# Altium PCB HONGGAN_拼版.PcbDoc (part 3 of 5)
Units mm, origin at the board's own origin, x right, y up, seen from the top; angles counter-clockwise.
Board outline 106.01 x 72.01 mm, 4 copper layers (Top Layer, Mid-Layer 1, Mid-Layer 2, Bottom Layer); 400 components, 0 nets, 1244 pads, 3211 vias.
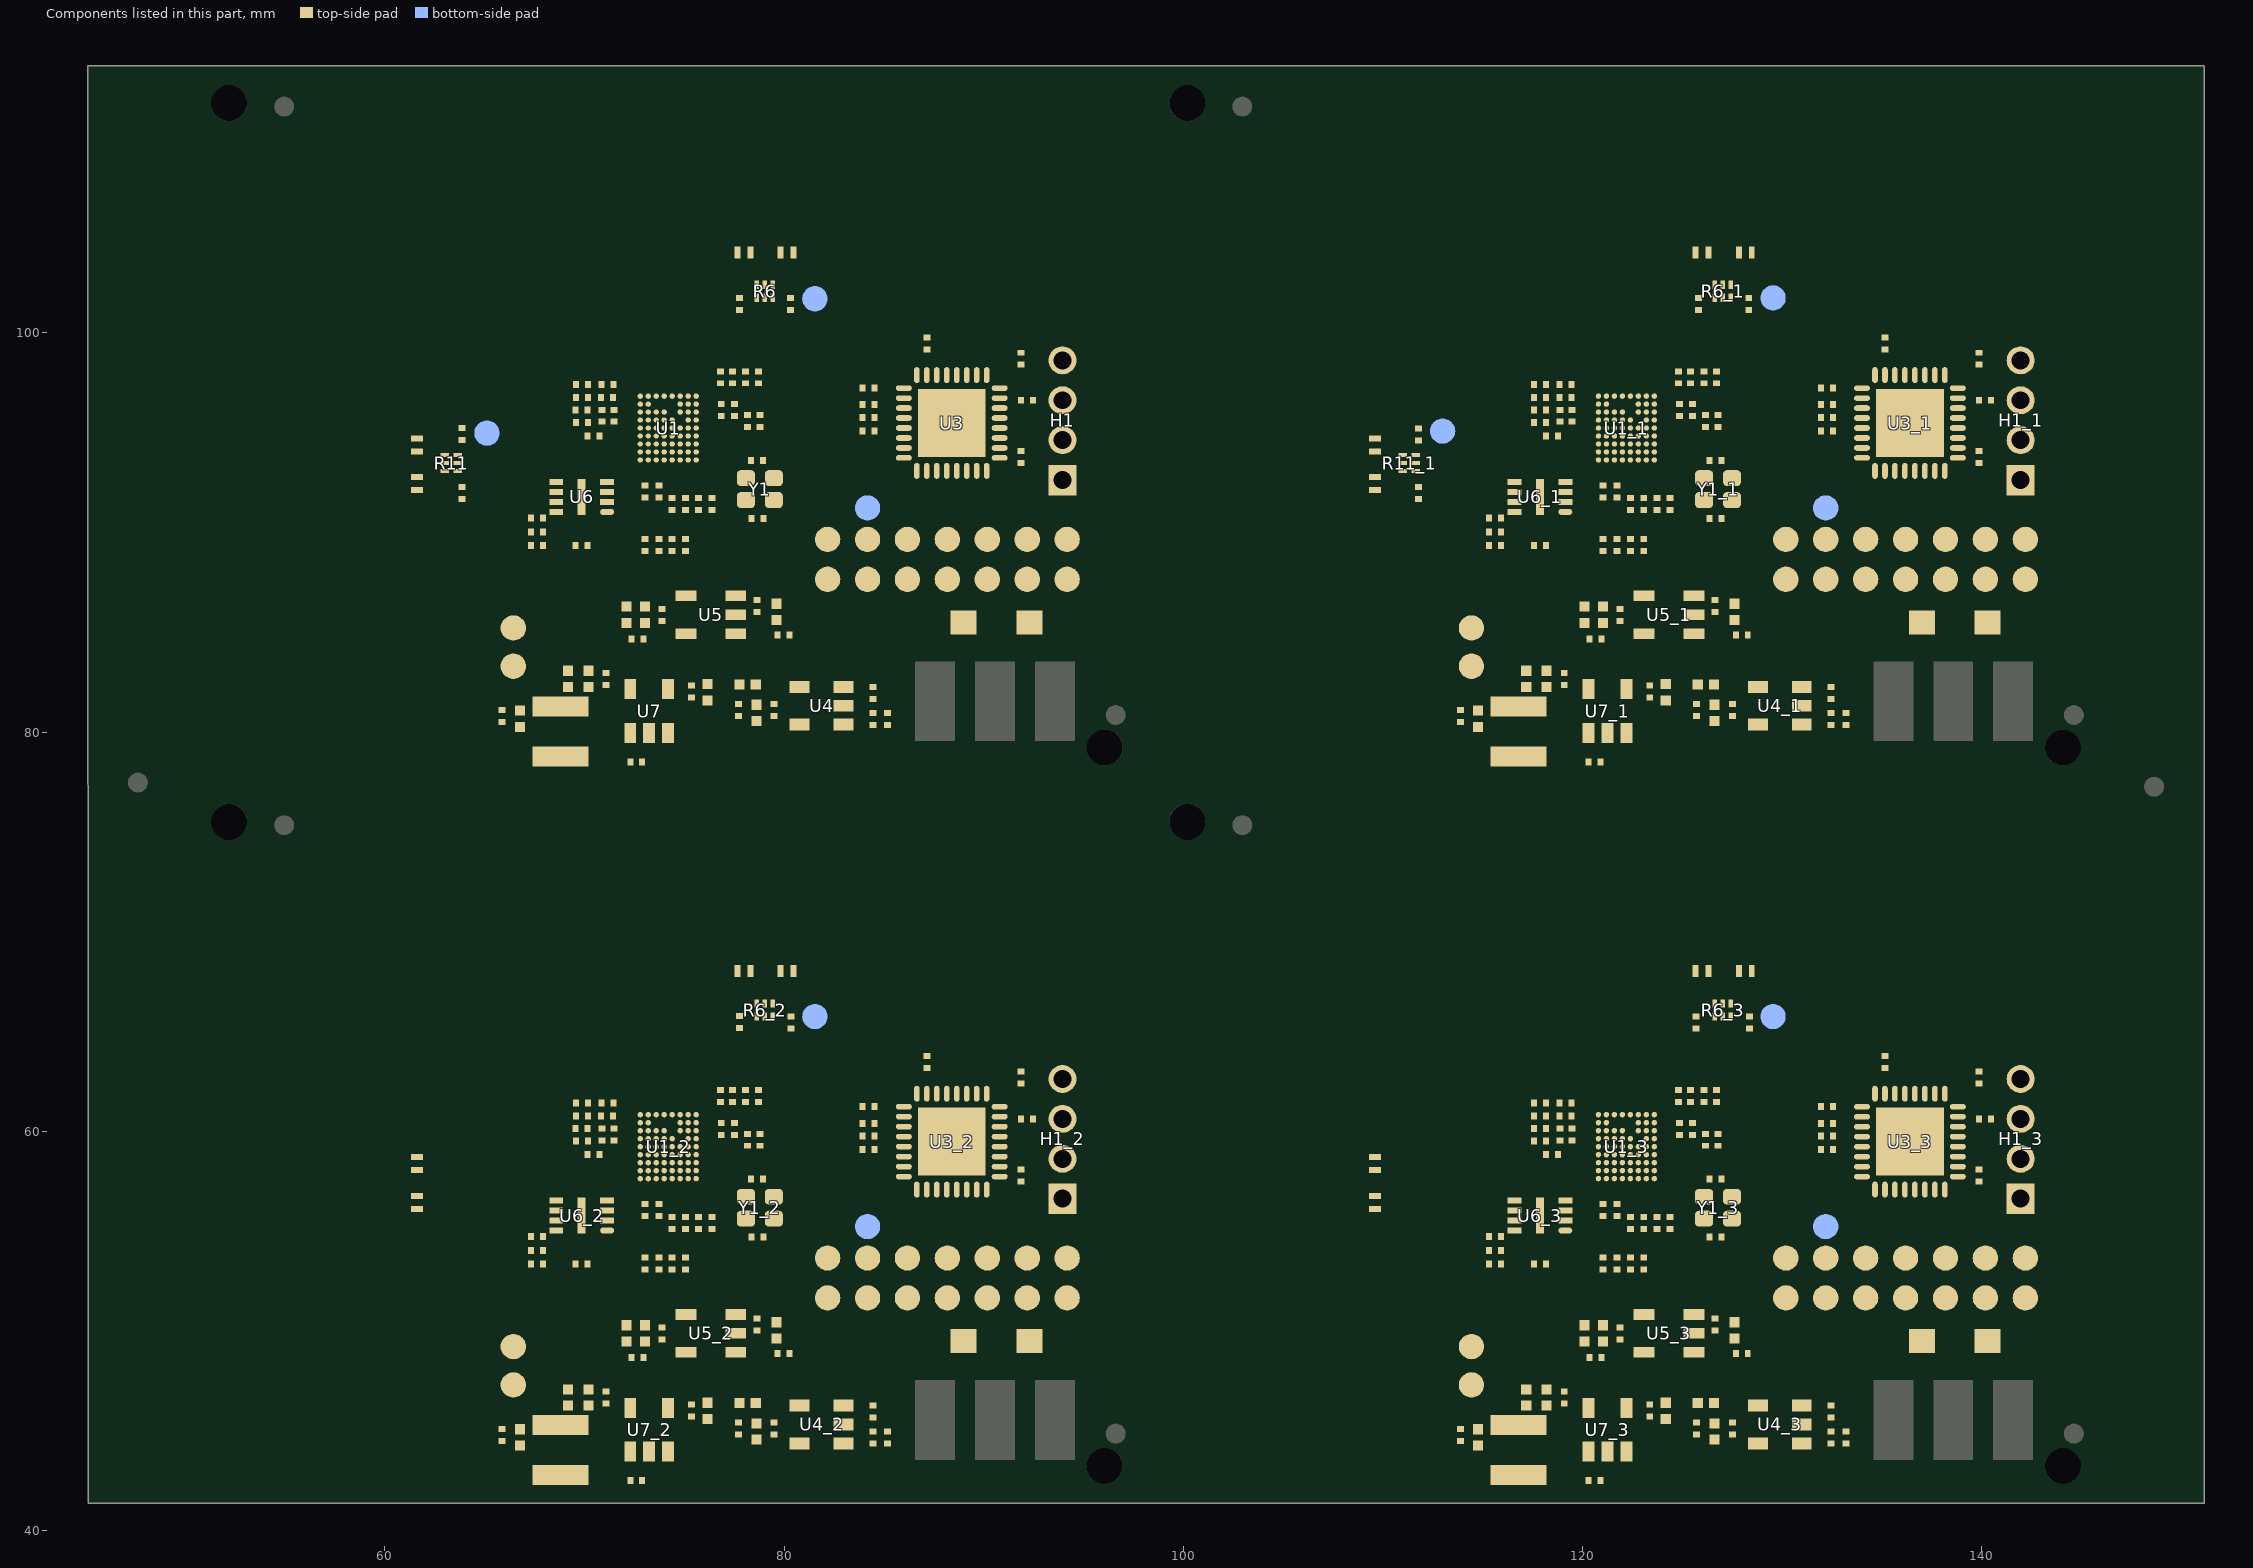
[diagram p5: the components of this part, seen from the top]

## Via types
v1: diameter 0.3, hole 0.2, Top Layer to Bottom Layer, tented both sides, 3151 vias
v2: diameter 0.5, hole 0.3, Top Layer to Bottom Layer, tented both sides, 48 vias
v3: diameter 0.3, hole 0.2, Top Layer to Bottom Layer, 12 vias

## Nets (pads, with @x,y where several pads share a name; then routed paths per layer and width w, separated by ;. In a path a pad name is that pad's centre, name@x,y a point inside that pad or via, vN(x,y) a via of type N, cw(c..) or ccw(c..) an arc to the next point about the centre after c; other vN are vias at no path point) (continued)
copper on no net: | length 2759.6
  Top Layer w0.147: v1(67.808,55.529) 68.583,55.529 ; v1(67.808,91.529) 68.583,91.529 ; v1(67.823,56.015) 67.837,56.029 68.583,56.029 ; v1(67.823,92.015) 67.837,92.029 68.583,92.029 ; 68.583,55.029 68.208,55.029 67.908,54.729 67.908,54.02 67.908,53.35 69.558,53.35 ; 68.583,56.529 69.775,57.721 70.875,57.721 72.387,59.233 72.792,59.233 ; 68.583,91.029 68.208,91.029 67.908,90.729 67.908,90.02 67.908,89.35 69.558,89.35 ; 68.583,92.529 69.775,93.721 70.875,93.721 72.387,95.233 72.792,95.233 ; 70.158,53.35 71.133,54.325 71.133,55.029 71.642,55.029 72.406,55.793 72.406,57.721 72.653,57.968 72.728,57.968 72.792,58.033 ; 70.158,89.35 71.133,90.325 71.133,91.029 71.642,91.029 72.406,91.793 72.406,93.721 72.653,93.968 72.728,93.968 72.792,94.033 ; 71.133,55.529 71.492,55.529 72.106,56.143 72.106,57.966 72.549,58.409 72.768,58.409 72.792,58.433 ; 71.133,56.029 71.483,56.029 71.806,56.352 71.806,58.09 72.548,58.833 72.792,58.833 ; 71.133,91.529 71.492,91.529 72.106,92.143 72.106,93.966 72.549,94.409 72.768,94.409 72.792,94.433 ; 71.133,92.029 71.483,92.029 71.806,92.352 71.806,94.09 72.548,94.833 72.792,94.833 ; v1(115.808,55.529) 116.583,55.529 ; v1(115.808,91.529) 116.583,91.529 ; v1(115.823,56.015) 115.837,56.029 116.583,56.029 ; v1(115.823,92.015) 115.837,92.029 116.583,92.029 ; 116.583,55.029 116.208,55.029 115.908,54.729 115.908,54.02 115.908,53.35 117.558,53.35 ; 116.583,56.529 117.775,57.721 118.875,57.721 120.387,59.233 120.792,59.233 ; 116.583,91.029 116.208,91.029 115.908,90.729 115.908,90.02 115.908,89.35 117.558,89.35 ; 116.583,92.529 117.775,93.721 118.875,93.721 120.387,95.233 120.792,95.233 ; 118.158,53.35 119.133,54.325 119.133,55.029 119.642,55.029 120.406,55.793 120.406,57.721 120.653,57.968 120.728,57.968 120.792,58.033 ; 118.158,89.35 119.133,90.325 119.133,91.029 119.642,91.029 120.406,91.793 120.406,93.721 120.653,93.968 120.728,93.968 120.792,94.033 ; 119.133,55.529 119.492,55.529 120.106,56.143 120.106,57.966 120.549,58.409 120.768,58.409 120.792,58.433 ; 119.133,56.029 119.483,56.029 119.806,56.352 119.806,58.09 120.548,58.833 120.792,58.833 ; 119.133,91.529 119.492,91.529 120.106,92.143 120.106,93.966 120.549,94.409 120.768,94.409 120.792,94.433 ; 119.133,92.029 119.483,92.029 119.806,92.352 119.806,94.09 120.548,94.833 120.792,94.833
  Top Layer w0.203: v3@58.144,44.968 59.773,44.968 ccw(c59.773,46.741) 61.027,45.487 ccw(c59.639,46.875) 61.602,46.875 61.602,56.118 ; v3@58.144,62.368 58.144,61.92 ccw(c61.348,61.92) 59.082,59.654 ccw(c61.348,61.92) 61.348,58.715 61.602,58.715 63.688,58.715 ccw(c63.688,59.618) 64.326,58.98 ccw(c61.595,62.437) 65.559,60.516 ccw(c60.177,63.123) 66.081,62.167 66.263,63.295 cw(c69.709,62.148) 67.141,64.716 cw(c70.356,61.501) 70.356,66.047 cw(c70.356,61.734) 73.406,64.784 cw(c71.992,63.37) 73.992,63.37 73.992,60.833 ; v3(58.144,80.968) 58.907,80.968 ccw(c58.907,83.439) 60.655,81.692 ccw(c58.369,83.978) 61.602,83.978 61.602,92.118 ccw(c61.602,93.166) 62.343,92.425 62.998,93.079 ; v3(58.144,98.368) 58.144,97.92 ccw(c60.684,97.92) 58.888,96.124 59.552,95.46 ccw(c61.348,97.256) 61.348,94.716 61.602,94.716 cw(c61.602,93.364) 62.558,94.32 62.998,93.88 ; 61.602,56.122 ccw(c61.88,60.985) 65.324,57.54 cw(c66.172,56.848) 65.519,57.727 66.884,59.092 ccw(c62.312,63.665) 68.286,61.19 ccw(c66.917,61.757) 68.399,61.757 cw(c71.186,61.757) 69.215,63.727 cw(c70.116,62.827) 70.116,64.101 70.723,64.101 cw(c70.723,61.561) 72.519,63.357 72.55,63.326 cw(c71,61.776) 73.192,61.776 73.192,60.833 ; 63.648,93.079 63.858,92.87 63.858,92.268 64.114,92.268 69.268,97.422 69.562,97.422 69.562,97.71 69.931,98.079 v2(71.439,98.079) ; 63.648,93.48 63.778,93.48 ccw(c63.778,94.47) 64.479,93.77 65.766,95.057 ccw(c63.969,96.853) 66.509,96.853 cw(c68.831,96.853) 67.189,98.494 67.863,99.167 cw(c70.116,96.914) 70.116,100.101 70.723,100.101 cw(c70.723,97.561) 72.519,99.357 72.55,99.326 cw(c71,97.776) 73.192,97.776 73.192,96.833 ; 63.648,93.88 63.648,94.435 63.858,94.645 64.782,94.645 v1(65.113,94.976) ; v1(66.637,51.401) v1(66.637,53.306) 66.681,53.35 67.308,53.35 ; v1(66.637,87.401) v1(66.637,89.306) 66.681,89.35 67.308,89.35 ; 68.796,42.787 69.848,42.787 71.872,44.811 73.701,44.811 74.191,44.321 74.191,43.951 ; 68.796,78.787 69.848,78.787 71.872,80.811 73.701,80.811 74.191,80.321 74.191,79.951 ; v1(69.555,58.833) 68.423,58.833 65.808,56.217 65.808,51.261 66.787,50.283 69.3,50.283 72.373,47.21 83.537,47.21 85.179,48.851 85.179,52.434 86.178,53.433 ; v1(69.555,94.833) 68.423,94.833 65.808,92.217 65.808,87.261 66.787,86.283 69.3,86.283 72.373,83.21 83.537,83.21 85.179,84.851 85.179,88.434 86.178,89.433 ; 69.559,60.148 69.559,59.511 69.562,59.508 v1@69.562,58.839 ; 69.559,96.148 69.559,95.511 69.562,95.508 v1@69.562,94.839 ; 69.562,61.422 69.562,62 70.076,62.514 v2(70.757,62.514) ; 70.159,60.148 70.162,60.151 70.162,61.422 ; 70.159,96.148 70.162,96.151 70.162,97.422 ; v2@70.744,58.147 70.751,58.153 70.751,58.826 70.757,58.833 71.412,58.833 72.212,59.633 72.792,59.633 ; v2@70.744,94.147 70.751,94.153 70.751,94.826 70.757,94.833 71.412,94.833 72.212,95.633 72.792,95.633 ; 70.867,60.148 71.467,60.148 71.582,60.033 72.792,60.033 ; 70.867,96.148 71.467,96.148 71.582,96.033 72.792,96.033 ; v1(71.254,42.511) 72.291,42.511 72.291,43.951 ; v1(71.254,78.511) 72.291,78.511 72.291,79.951 ; v3@71.726,71.297 72.482,70.541 ccw(c74.278,72.337) 74.278,69.797 74.852,69.797 cw(c74.852,67.257) 76.648,69.053 77.663,68.038 ccw(c79.288,68.038) 78.139,66.889 78.626,66.402 ; v3(71.726,107.297) 72.482,106.541 ccw(c74.278,108.337) 74.278,105.797 74.852,105.797 cw(c74.852,103.257) 76.648,105.053 77.663,104.038 ccw(c79.288,104.038) 78.139,102.889 78.626,102.402 ; v1(72.757,92.885) 73.179,93.307 73.179,93.62 73.192,93.633 ; 73.022,53.675 v1(73.022,54.188) ; 73.022,55.751 73.057,55.716 73.057,55.368 72.496,54.807 72.496,52.594 73.436,51.655 82.189,51.655 ; 73.022,56.351 73.592,56.92 73.592,57.633 ; 73.022,89.675 v1(73.022,90.188) ; 73.022,91.751 73.057,91.716 73.057,91.368 72.496,90.807 72.496,88.594 73.436,87.655 82.189,87.655 ; 73.022,92.351 73.592,92.92 73.592,93.633 ; 73.029,53.068 73.808,52.29 81.592,52.29 82.065,52.762 82.808,52.762 83.479,53.433 84.127,53.433 ; 73.029,89.068 73.579,88.518 81.831,88.518 82.546,88.518 82.555,88.509 83.479,89.433 84.127,89.433 ; 73.727,53.075 74.392,53.075 ; 73.727,53.675 73.752,53.675 73.8,53.723 73.8,54.099 74.013,54.311 v1(74.013,54.324) ; v1(73.727,54.945) 73.727,55.751 ; 73.727,56.351 73.992,56.616 73.992,57.633 ; 73.727,89.075 74.392,89.075 ; 73.727,89.675 73.752,89.675 73.8,89.723 73.8,90.099 74.013,90.311 v1(74.013,90.324) ; v1(73.727,90.945) 73.727,91.751 ; 73.727,92.351 73.992,92.616 73.992,93.633 ; v1(74.392,52.897) 74.392,53.075 ; 74.392,53.675 v1(74.392,54.099) 74.392,55.118 ; 74.392,55.718 74.392,56.15 74.688,56.446 74.762,56.446 v1(74.771,56.455) ; 74.392,60.833 cw(c77.514,60.833) 75.306,63.04 75.508,63.242 cw(c77.582,61.168) 77.582,64.101 ccw(c77.582,65.622) 78.657,64.546 ccw(c77.768,65.436) 79.026,65.436 79.026,65.752 ; v1(74.392,88.897) 74.392,89.075 ; 74.392,89.675 v1(74.392,90.099) 74.392,91.118 ; 74.392,91.718 74.392,92.15 74.688,92.446 74.762,92.446 v1(74.771,92.455) ; 74.392,96.833 cw(c77.514,96.833) 75.306,99.04 75.508,99.242 cw(c77.582,97.168) 77.582,100.101 ccw(c77.582,101.622) 78.657,100.546 ccw(c77.768,101.436) 79.026,101.436 79.026,101.752 ; 74.792,57.633 74.792,57.38 75.717,56.455 75.717,55.718 ; 74.792,93.633 74.792,93.38 75.717,92.455 75.717,91.718 ; 75.062,53.075 74.392,53.075 ; 75.062,55.118 75.062,53.675 80.087,53.675 80.734,54.322 80.734,55.544 82.274,57.084 86.646,57.084 86.646,56.538 89.751,53.433 90.178,53.433 ; 75.062,55.718 75.062,56.173 75.178,56.288 75.178,56.44 v1(75.187,56.449) ; 75.062,89.075 74.392,89.075 ; 75.062,91.118 75.062,89.675 80.087,89.675 80.734,90.322 80.734,91.544 82.274,93.084 86.646,93.084 86.646,92.538 89.751,89.433 90.178,89.433 ; 75.062,91.718 75.062,92.173 75.178,92.288 75.178,92.44 v1(75.187,92.449) ; 75.192,60.433 75.592,60.433 78.073,60.433 ; 75.192,60.833 75.203,60.844 75.203,60.994 75.431,61.222 75.685,61.476 76.803,61.476 77.407,61.476 ; 75.192,96.433 75.592,96.433 78.073,96.433 ; 75.192,96.833 75.203,96.844 75.203,96.994 75.431,97.222 75.685,97.476 76.803,97.476 77.407,97.476 ; 75.592,58.433 75.592,58.033 75.603,58.022 75.753,58.022 76.073,57.702 76.073,56.335 76.382,56.026 76.382,55.718 ; 75.592,58.833 75.763,58.833 76.325,58.271 76.329,58.271 77.229,57.37 77.229,56.173 77.779,55.623 78.084,55.623 78.084,54.988 78.366,54.706 ; 75.592,59.233 75.628,59.196 75.743,59.196 75.751,59.188 75.911,59.188 76.473,58.626 76.476,58.626 76.991,58.112 78.618,58.112 78.95,57.78 78.95,57.605 78.95,57.257 79.484,56.723 ; 75.592,60.033 75.999,60.033 76.445,59.586 76.445,59.583 76.579,59.449 76.582,59.449 76.603,59.428 78.008,59.428 78.158,59.278 ; 75.592,60.833 77.77,60.833 78.073,61.136 78.073,61.476 78.708,61.476 ; 75.592,94.433 75.592,94.033 75.603,94.022 75.753,94.022 76.073,93.702 76.073,92.335 76.382,92.026 76.382,91.718 ; 75.592,94.833 75.763,94.833 76.325,94.271 76.329,94.271 77.229,93.37 77.229,92.173 77.779,91.623 78.084,91.623 78.084,90.988 78.366,90.706 ; 75.592,95.233 75.628,95.196 75.743,95.196 75.751,95.188 75.911,95.188 76.473,94.626 76.476,94.626 76.991,94.112 78.618,94.112 78.95,93.78 78.95,93.605 78.95,93.257 79.484,92.723 ; 75.592,96.033 75.999,96.033 76.445,95.586 76.445,95.583 76.579,95.449 76.582,95.449 76.603,95.428 78.008,95.428 78.158,95.278 ; 75.592,96.833 77.77,96.833 78.073,97.136 78.073,97.476 78.708,97.476 ; v2(77.058,65.752) 78.626,65.752 ; v2(77.058,101.752) 78.626,101.752 ; 78.708,62.076 v2(79.047,62.076) ; 78.708,98.076 v2(79.047,98.076) ; 79.426,65.752 80.353,65.752 81.525,65.752 v1(81.54,65.736) ; 79.426,66.402 80.055,67.031 ccw(c79.049,68.038) 80.472,68.038 85.153,68.038 ccw(c85.153,70.578) 86.949,68.782 89.247,71.08 ; 79.426,101.752 80.147,101.752 ; 79.426,102.402 80.055,103.031 ccw(c79.049,104.038) 80.472,104.038 85.153,104.038 ccw(c85.153,106.578) 86.949,104.782 89.247,107.08 ; 80.322,101.736 81.513,101.736 v1(81.54,101.708) ; v1(81.54,61.499) 81.54,58.417 82.224,57.734 85.995,57.734 ; v1(81.54,97.499) 81.54,94.417 82.224,93.734 85.995,93.734 ; v1(84.532,58.259) 84.567,58.224 85.985,58.224 85.995,58.234 ; v1(84.532,60.403) 84.532,59.769 84.567,59.734 85.995,59.734 ; v1(84.532,94.259) 84.567,94.224 85.985,94.224 85.995,94.234 ; v1(84.532,96.403) 84.532,95.769 84.567,95.734 85.995,95.734 ; 87.145,61.884 87.145,63.166 ; 87.145,97.884 87.145,99.166 ; 89.247,71.08 ccw(c89.03,71.297) v3@89.337,71.297 ; 89.247,107.08 ccw(c89.03,107.297) v3(89.337,107.297) ; 90.178,51.655 91.448,50.385 94.831,50.385 95.593,51.147 95.593,63.212 94.621,64.184 93.942,64.184 ; 90.178,87.655 91.448,86.385 94.831,86.385 95.593,87.147 95.593,99.212 94.621,100.184 93.942,100.184 ; 90.796,57.734 91.165,57.734 v2@91.868,57.031 ; 90.796,58.734 v1@91.367,58.734 ; 90.796,60.734 91.758,60.734 91.868,60.624 91.868,61.094 92.418,61.644 93.942,61.644 ; 90.796,61.234 91.367,61.234 91.868,61.734 91.868,62.404 92.168,62.404 92.468,62.704 92.468,63.697 92.955,64.184 93.942,64.184 ; 90.796,93.734 91.165,93.734 v2@91.868,93.031 ; 90.796,94.734 v1(91.367,94.734) ; 90.796,96.734 91.758,96.734 91.868,96.624 91.868,97.094 92.418,97.644 93.942,97.644 ; 90.796,97.234 91.367,97.234 91.868,97.734 91.868,98.404 92.168,98.404 92.468,98.704 92.468,99.697 92.955,100.184 93.942,100.184 ; 91.868,57.484 v2@91.868,57.031 ; 91.868,93.484 v2@91.868,93.031 ; v2@91.889,56.967 92.178,56.679 v2(92.178,56.354) 92.178,55.433 94.178,53.433 ; v2@91.889,92.967 92.178,92.679 v2(92.178,92.354) 92.178,91.433 94.178,89.433 ; v2(91.91,56.989) v2@91.868,57.031 ; v2(91.91,92.989) v2@91.868,93.031 ; 92.127,51.655 92.527,51.655 93.441,50.74 94.552,50.74 95.212,51.401 95.212,60.755 94.323,61.644 93.942,61.644 ; 92.127,87.655 92.527,87.655 93.441,86.74 94.552,86.74 95.212,87.401 95.212,96.755 94.323,97.644 93.942,97.644 ; v1(92.468,59.942) 92.468,60.624 ; v1(92.468,95.942) 92.468,96.624 ; 93.942,60.624 93.942,61.644 ; 93.942,62.624 93.942,64.184 ; 93.942,96.624 93.942,97.644 ; 93.942,98.624 93.942,100.184 ; v3(106.144,43.468) ccw(c106.144,46.961) 108.614,44.491 ccw(c106.23,46.875) 109.602,46.875 109.602,56.118 ; v3(106.144,60.868) ccw(c107.269,60.868) 106.473,60.072 106.757,59.789 ccw(c109.348,62.38) 109.348,58.715 109.602,58.715 111.688,58.715 ccw(c111.688,59.618) 112.326,58.98 ccw(c109.595,62.437) 113.559,60.516 ccw(c108.177,63.123) 114.081,62.167 114.263,63.295 cw(c117.709,62.148) 115.141,64.716 cw(c118.356,61.501) 118.356,66.047 cw(c118.356,61.734) 121.406,64.784 cw(c119.992,63.37) 121.992,63.37 121.992,60.833 ; v1(106.144,79.468) 108.858,82.182 ccw(c107.062,83.978) 109.602,83.978 109.602,92.118 ccw(c109.602,93.166) 110.343,92.425 110.998,93.079 ; v1(106.144,96.868) 107.552,95.46 ccw(c109.348,97.256) 109.348,94.716 109.602,94.716 cw(c109.602,93.364) 110.558,94.32 110.998,93.88 ; 109.602,56.122 ccw(c109.88,60.985) 113.324,57.54 cw(c114.172,56.848) 113.519,57.727 114.884,59.092 ccw(c110.312,63.665) 116.286,61.19 ccw(c114.917,61.757) 116.399,61.757 cw(c119.186,61.757) 117.215,63.727 cw(c118.116,62.827) 118.116,64.101 118.723,64.101 cw(c118.723,61.561) 120.519,63.357 120.55,63.326 cw(c119,61.776) 121.192,61.776 121.192,60.833 ; 111.648,93.48 111.778,93.48 ccw(c111.778,94.47) 112.479,93.77 113.766,95.057 ccw(c111.969,96.853) 114.509,96.853 cw(c116.831,96.853) 115.189,98.494 115.863,99.167 cw(c118.116,96.914) 118.116,100.101 118.723,100.101 cw(c118.723,97.561) 120.519,99.357 120.55,99.326 cw(c119,97.776) 121.192,97.776 121.192,96.833 ; 111.648,93.88 111.648,94.473 111.778,94.603 112.025,94.85 112.037,94.85 112.091,94.903 v1(112.926,94.903) ; 111.778,92.279 111.778,92.949 111.648,93.079 112.926,93.079 117.268,97.422 117.562,97.422 117.562,97.71 117.931,98.079 v2(119.439,98.079) ; v1(114.637,51.401) v1(114.637,53.306) 114.681,53.35 115.308,53.35 ; v1(114.637,87.401) v1(114.637,89.306) 114.681,89.35 115.308,89.35 ; 116.796,42.787 117.848,42.787 119.872,44.811 121.701,44.811 122.191,44.321 122.191,43.951 ; 116.796,78.787 117.848,78.787 119.872,80.811 121.701,80.811 122.191,80.321 122.191,79.951 ; v1(117.555,58.833) 116.423,58.833 113.808,56.217 113.808,51.261 114.787,50.283 117.3,50.283 120.373,47.21 131.537,47.21 133.179,48.851 133.179,52.434 134.178,53.433 ; v1(117.555,94.833) 116.423,94.833 113.808,92.217 113.808,87.261 114.787,86.283 117.3,86.283 120.373,83.21 131.537,83.21 133.179,84.851 133.179,88.434 134.178,89.433 ; 117.559,60.148 117.559,59.511 117.562,59.508 v1@117.562,58.839 ; 117.559,96.148 117.559,95.511 117.562,95.508 v1@117.562,94.839 ; 117.562,61.422 117.562,62 118.076,62.514 v2(118.757,62.514) ; 118.159,60.148 118.162,60.151 118.162,61.422 ; 118.159,96.148 118.162,96.151 118.162,97.422 ; v2@118.744,58.147 118.751,58.153 118.751,58.826 118.757,58.833 119.412,58.833 120.212,59.633 120.792,59.633 ; v2@118.744,94.147 118.751,94.153 118.751,94.826 118.757,94.833 119.412,94.833 120.212,95.633 120.792,95.633 ; 118.867,60.148 119.467,60.148 119.582,60.033 120.792,60.033 ; 118.867,96.148 119.467,96.148 119.582,96.033 120.792,96.033 ; v1(119.254,42.511) 120.291,42.511 120.291,43.951 ; v1(119.254,78.511) 120.291,78.511 120.291,79.951 ; v3(119.726,69.797) 122.852,69.797 cw(c122.852,67.257) 124.648,69.053 125.663,68.038 ccw(c127.288,68.038) 126.139,66.889 126.626,66.402 ; v1(119.726,105.797) 122.852,105.797 cw(c122.852,103.257) 124.648,105.053 125.663,104.038 ccw(c127.288,104.038) 126.139,102.889 126.626,102.402 ; v1(120.757,92.885) 121.179,93.307 121.179,93.62 121.192,93.633 ; 121.022,53.675 v1(121.022,54.188) ; 121.022,55.751 121.057,55.716 121.057,55.368 120.496,54.807 120.496,52.594 121.436,51.655 130.189,51.655 ; 121.022,56.351 121.592,56.92 121.592,57.633 ; 121.022,89.675 v1(121.022,90.188) ; 121.022,91.751 121.057,91.716 121.057,91.368 120.496,90.807 120.496,88.594 121.436,87.655 130.189,87.655 ; 121.022,92.351 121.592,92.92 121.592,93.633 ; 121.029,53.068 121.579,52.518 129.831,52.518 130.546,52.518 130.555,52.509 131.479,53.433 132.127,53.433 ; 121.029,89.068 121.686,88.411 129.761,88.411 130.043,88.692 130.739,88.692 131.479,89.433 132.127,89.433 ; 121.727,53.075 122.392,53.075 ; 121.727,53.675 121.752,53.675 121.8,53.723 121.8,54.099 122.013,54.311 v1(122.013,54.324) ; v1(121.727,54.945) 121.727,55.751 ; 121.727,56.351 121.992,56.616 121.992,57.633 ; 121.727,89.075 122.392,89.075 ; 121.727,89.675 121.752,89.675 121.8,89.723 121.8,90.099 122.013,90.311 v1(122.013,90.324) ; v1(121.727,90.945) 121.727,91.751 ; 121.727,92.351 121.992,92.616 121.992,93.633 ; v1(122.392,52.897) 122.392,53.075 ; 122.392,53.675 v1(122.392,54.099) 122.392,55.118 ; 122.392,55.718 122.392,56.15 122.688,56.446 122.762,56.446 v1(122.771,56.455) ; 122.392,60.833 cw(c125.514,60.833) 123.306,63.04 123.508,63.242 cw(c125.582,61.168) 125.582,64.101 ccw(c125.582,65.622) 126.657,64.546 ccw(c125.768,65.436) 127.026,65.436 127.026,65.752 ; v1(122.392,88.897) 122.392,89.075 ; 122.392,89.675 v1(122.392,90.099) 122.392,91.118 ; 122.392,91.718 122.392,92.15 122.688,92.446 122.762,92.446 v1(122.771,92.455) ; 122.392,96.833 cw(c125.514,96.833) 123.306,99.04 123.508,99.242 cw(c125.582,97.168) 125.582,100.101 ccw(c125.582,101.622) 126.657,100.546 ccw(c125.768,101.436) 127.026,101.436 127.026,101.752 ; 122.792,57.633 122.792,57.38 123.717,56.455 123.717,55.718 ; 122.792,93.633 122.792,93.38 123.717,92.455 123.717,91.718 ; 123.062,53.075 122.392,53.075 ; 123.062,55.118 123.062,53.675 128.087,53.675 128.734,54.322 128.734,55.544 130.274,57.084 134.646,57.084 134.646,56.538 137.751,53.433 138.178,53.433 ; 123.062,55.718 123.062,56.173 123.178,56.288 123.178,56.44 v1(123.187,56.449) ; 123.062,89.075 122.392,89.075 ; 123.062,91.118 123.062,89.675 128.087,89.675 128.734,90.322 128.734,91.544 130.274,93.084 134.646,93.084 134.646,92.538 137.751,89.433 138.178,89.433 ; 123.062,91.718 123.062,92.173 123.178,92.288 123.178,92.44 v1(123.187,92.449) ; 123.192,60.433 123.592,60.433 126.073,60.433 ; 123.192,60.833 123.203,60.844 123.203,60.994 123.431,61.222 123.685,61.476 124.803,61.476 125.407,61.476 ; 123.192,96.433 123.592,96.433 126.073,96.433 ; 123.192,96.833 123.203,96.844 123.203,96.994 123.431,97.222 123.685,97.476 124.803,97.476 125.407,97.476 ; 123.592,58.433 123.592,58.033 123.603,58.022 123.753,58.022 124.073,57.702 124.073,56.335 124.382,56.026 124.382,55.718 ; 123.592,58.833 123.763,58.833 124.325,58.271 124.329,58.271 125.229,57.37 125.229,56.173 125.779,55.623 126.084,55.623 126.084,54.988 126.366,54.706 ; 123.592,59.233 123.628,59.196 123.743,59.196 123.751,59.188 123.911,59.188 124.473,58.626 124.476,58.626 124.991,58.112 126.618,58.112 126.95,57.78 126.95,57.605 126.95,57.257 127.484,56.723 ; 123.592,60.033 123.999,60.033 124.445,59.586 124.445,59.583 124.579,59.449 124.582,59.449 124.603,59.428 126.008,59.428 126.158,59.278 ; 123.592,60.833 125.77,60.833 126.073,61.136 126.073,61.476 126.708,61.476 ; 123.592,94.433 123.592,94.033 123.603,94.022 123.753,94.022 124.073,93.702 124.073,92.335 124.382,92.026 124.382,91.718 ; 123.592,94.833 123.763,94.833 124.325,94.271 124.329,94.271 125.229,93.37 125.229,92.173 125.779,91.623 126.084,91.623 126.084,90.988 126.366,90.706 ; 123.592,95.233 123.628,95.196 123.743,95.196 123.751,95.188 123.911,95.188 124.473,94.626 124.476,94.626 124.991,94.112 126.618,94.112 126.95,93.78 126.95,93.605 126.95,93.257 127.484,92.723 ; 123.592,96.033 123.999,96.033 124.445,95.586 124.445,95.583 124.579,95.449 124.582,95.449 124.603,95.428 126.008,95.428 126.158,95.278 ; 123.592,96.833 125.77,96.833 126.073,97.136 126.073,97.476 126.708,97.476 ; v2(125.058,65.752) 126.626,65.752 ; v2(125.058,101.752) 125.859,101.752 126.626,101.752 ; 126.708,62.076 v2(127.047,62.076) ; 126.708,98.076 v2(127.047,98.076) ; 127.426,65.752 128.147,65.752 129.474,65.752 v1(129.49,65.736) ; 127.426,66.402 128.055,67.031 ccw(c127.049,68.038) 128.472,68.038 133.153,68.038 ccw(c133.153,70.578) 134.949,68.781 135.22,69.053 cw(c137.016,67.257) 137.016,69.797 v3(137.337,69.797) ; 127.426,101.752 v1(129.541,101.752) ; 127.426,102.402 128.055,103.031 ccw(c127.049,104.038) 128.472,104.038 133.153,104.038 ccw(c133.153,106.578) 134.949,104.781 135.22,105.053 cw(c137.016,103.257) 137.016,105.797 v1(137.337,105.797) ; v1(129.541,61.499) 129.541,58.417 130.224,57.734 133.995,57.734 ; v1(129.541,97.499) 129.541,94.417 130.224,93.734 133.995,93.734 ; v1(132.532,58.259) 132.567,58.224 133.985,58.224 133.995,58.234 ; v1(132.532,60.403) 132.532,59.769 132.567,59.734 133.995,59.734 ; v1(132.532,94.259) 132.567,94.224 133.985,94.224 133.995,94.234 ; v1(132.532,96.403) 132.532,95.769 132.567,95.734 133.995,95.734 ; 135.145,61.884 135.145,63.166 ; 135.145,97.884 135.145,99.166 ; 138.178,51.655 139.448,50.385 142.831,50.385 143.593,51.147 143.593,63.212 142.621,64.184 141.942,64.184 ; 138.178,87.655 139.448,86.385 142.831,86.385 143.593,87.147 143.593,99.212 142.621,100.184 141.942,100.184 ; 138.796,57.734 139.165,57.734 v2@139.868,57.031 ; 138.796,58.734 v1@139.367,58.734 ; 138.796,60.734 139.758,60.734 139.868,60.624 139.868,61.094 140.418,61.644 141.942,61.644 ; 138.796,61.234 139.367,61.234 139.868,61.734 139.868,62.404 140.168,62.404 140.468,62.704 140.468,63.697 140.955,64.184 141.942,64.184 ; 138.796,93.734 139.165,93.734 v2@139.868,93.031 ; 138.796,94.734 v1(139.367,94.734) ; 138.796,96.734 139.758,96.734 139.868,96.624 139.868,97.094 140.418,97.644 141.942,97.644 ; 138.796,97.234 139.367,97.234 139.868,97.734 139.868,98.404 140.168,98.404 140.468,98.704 140.468,99.697 140.955,100.184 141.942,100.184 ; 139.868,57.484 v2@139.868,57.031 ; 139.868,93.484 v2@139.868,93.031 ; v2@139.889,56.967 140.178,56.679 v2(140.178,56.354) 140.178,55.433 142.178,53.433 ; v2@139.889,92.967 140.178,92.679 v2(140.178,92.354) 140.178,91.433 142.178,89.433 ; v2(139.91,56.989) v2@139.868,57.031 ; v2(139.91,92.989) v2@139.868,93.031 ; 140.127,51.655 140.527,51.655 141.441,50.74 142.552,50.74 143.212,51.401 143.212,60.755 142.323,61.644 141.942,61.644 ; 140.127,87.655 140.527,87.655 141.441,86.74 142.552,86.74 143.212,87.401 143.212,96.755 142.323,97.644 141.942,97.644 ; v1(140.468,59.942) 140.468,60.624 ; v1(140.468,95.942) 140.468,96.624 ; 141.942,60.624 141.942,61.644 ; 141.942,62.624 141.942,64.184 ; 141.942,96.624 141.942,97.644 ; 141.942,98.624 141.942,100.184
  Top Layer w0.254: 66.431,47.299 66.431,45.532 66.508,45.455 ; 66.431,83.299 66.431,81.532 66.508,81.455 ; 69.177,47.071 70.973,47.071 71.079,46.964 71.477,46.964 72.291,46.15 ; 69.177,83.071 70.973,83.071 71.079,82.964 71.477,82.964 72.291,82.15 ; v2(71.439,62.079) 71.439,61.422 71.439,60.77 71.437,60.768 71.795,60.768 72.13,60.433 72.62,60.433 72.624,60.428 72.788,60.428 ; v2(71.439,98.079) 71.439,97.422 71.437,97.419 71.437,96.768 71.648,96.768 71.988,96.428 72.733,96.428 ; 72.095,50.283 73.029,50.283 73.135,50.177 73.876,50.177 74.526,50.827 75.077,50.827 ; 72.095,86.283 73.029,86.283 73.135,86.177 73.876,86.177 74.526,86.827 75.077,86.827 ; 77.576,50.827 78.172,50.827 78.372,50.627 78.631,50.627 79.098,50.627 79.292,50.433 79.616,50.433 ; 77.576,86.827 78.172,86.827 78.372,86.627 78.631,86.627 79.098,86.627 79.292,86.433 79.616,86.433 ; 78.578,46.385 78.612,46.351 78.612,45.37 78.654,45.411 79.501,45.411 80.36,46.27 80.777,46.27 ; 78.578,82.385 78.612,82.351 78.612,81.37 78.654,81.411 79.501,81.411 80.36,82.27 80.777,82.27 ; 79.501,44.811 79.942,44.37 80.777,44.37 ; 79.501,80.811 79.942,80.37 80.777,80.37 ; 79.616,49.62 82.093,49.62 84.127,51.655 ; 79.616,85.62 82.093,85.62 84.127,87.655 ; v2(82.627,58.594) 82.627,59.234 83.162,59.769 83.932,59.769 ; v2(82.627,94.594) 82.627,95.234 83.162,95.769 83.932,95.769 ; 82.977,46.27 82.992,46.255 84.454,46.255 85.013,46.255 85.188,46.08 85.188,44.954 ; 82.977,82.27 82.992,82.255 84.454,82.255 85.013,82.255 85.188,82.08 85.188,80.954 ; v2@83.02,58.386 v2(83.147,58.386) 84.034,58.386 84.532,58.884 84.532,59.094 84.672,59.234 85.995,59.234 ; v2@83.02,94.386 v2(83.147,94.386) 84.034,94.386 84.532,94.884 84.532,95.094 84.672,95.234 85.995,95.234 ; v2(84.532,61.844) 84.532,61.234 85.995,61.234 ; v2(84.532,97.844) 84.532,97.234 85.995,97.234 ; 114.431,47.299 114.431,45.532 114.508,45.455 ; 114.431,83.299 114.431,81.532 114.508,81.455 ; 117.177,47.071 118.973,47.071 119.079,46.964 119.477,46.964 120.291,46.15 ; 117.177,83.071 118.973,83.071 119.079,82.964 119.477,82.964 120.291,82.15 ; v2(119.439,62.079) 119.439,61.422 119.439,60.77 119.437,60.768 119.795,60.768 120.13,60.433 120.62,60.433 120.624,60.428 120.788,60.428 ; v2(119.439,98.079) 119.439,97.422 119.437,97.419 119.437,96.768 119.648,96.768 119.988,96.428 120.733,96.428 ; 120.095,50.283 121.029,50.283 121.135,50.177 121.876,50.177 122.526,50.826 123.077,50.826 ; 120.095,86.283 121.029,86.283 121.135,86.177 121.876,86.177 122.526,86.827 123.077,86.827 ; 125.576,50.826 126.172,50.826 126.372,50.627 126.631,50.627 127.098,50.627 127.292,50.433 127.616,50.433 ; 125.576,86.827 126.172,86.827 126.372,86.627 126.631,86.627 127.098,86.627 127.292,86.433 127.616,86.433 ; 126.578,46.385 126.612,46.351 126.612,45.37 126.654,45.411 127.501,45.411 128.36,46.27 128.777,46.27 ; 126.578,82.385 126.612,82.351 126.612,81.37 126.654,81.411 127.501,81.411 128.36,82.27 128.777,82.27 ; 127.501,44.811 127.942,44.37 128.777,44.37 ; 127.501,80.811 127.942,80.37 128.777,80.37 ; 127.616,49.62 130.093,49.62 132.127,51.655 ; 127.616,85.62 130.093,85.62 132.127,87.655 ; v2(130.627,58.594) 130.627,59.234 131.162,59.769 131.932,59.769 ; v2(130.627,94.594) 130.627,95.234 131.162,95.769 131.932,95.769 ; 130.977,46.27 130.992,46.255 132.454,46.255 133.013,46.255 133.188,46.08 133.188,44.954 ; 130.977,82.27 130.992,82.255 132.454,82.255 133.013,82.255 133.188,82.08 133.188,80.954 ; v2@131.02,58.386 v2(131.147,58.386) 132.034,58.386 132.532,58.884 132.532,59.094 132.672,59.234 133.995,59.234 ; v2@131.02,94.386 v2(131.147,94.386) 132.034,94.386 132.532,94.884 132.532,95.094 132.672,95.234 133.995,95.234 ; v2(132.532,61.844) 132.532,61.234 133.995,61.234 ; v2(132.532,97.844) 132.532,97.234 133.995,97.234
  Top Layer w0.305: 86.178,51.655 88.337,49.496 88.99,49.496 ; 86.178,87.655 88.337,85.496 88.99,85.496 ; 134.178,51.655 136.337,49.496 136.99,49.496 ; 134.178,87.655 136.337,85.496 136.99,85.496
  Top Layer w0.381: 87.567,45.543 87.567,48.073 88.99,49.496 ; 87.567,81.543 87.567,84.073 88.99,85.496 ; 135.567,45.543 135.567,48.073 136.99,49.496 ; 135.567,81.543 135.567,84.073 136.99,85.496
  Mid-Layer 2 w0.203: 74.392,48.988 v1(74.392,52.897) ; 74.392,84.988 v1(74.392,88.897) ; v2(77.058,65.752) 79.571,65.752 80.607,64.715 80.607,63.636 v2(79.047,62.076) ; v2(77.058,101.752) 79.571,101.752 80.607,100.715 80.607,99.636 v2(79.047,98.076) ; v2(91.91,56.989) 92.468,57.546 v1(92.468,59.942) ; v2(91.91,92.989) 92.468,93.546 v1(92.468,95.942) ; 122.392,48.988 v1(122.392,52.897) ; 122.392,84.988 v1(122.392,88.897) ; v2(125.058,65.752) 127.571,65.752 128.607,64.715 128.607,63.636 v2(127.047,62.076) ; v2(125.058,101.752) 127.571,101.752 128.607,100.715 128.607,99.636 v2(127.047,98.076) ; v2(139.91,56.989) 140.468,57.546 v1(140.468,59.942) ; v2(139.91,92.989) 140.468,93.546 v1(140.468,95.942)
  Mid-Layer 2 w0.254: 70.574,45.313 70.744,45.483 v2@70.744,58.147 ; 70.574,81.313 70.744,81.483 v2@70.744,94.147 ; 72.352,45.178 72.479,45.305 72.479,51.744 73.632,52.897 74.036,53.302 79.787,53.302 80.734,54.248 80.734,57.506 79.292,58.948 79.292,59.951 78.798,60.445 78.334,60.445 78.321,60.433 78.073,60.433 ; 72.352,81.178 72.479,81.305 72.479,87.744 73.632,88.897 74.036,89.302 79.787,89.302 80.734,90.248 80.734,93.506 79.292,94.948 79.292,95.951 78.798,96.445 78.334,96.445 78.321,96.433 78.073,96.433 ; v2(82.627,58.594) 82.627,59.198 84.532,61.103 v2(84.532,61.844) ; v2(82.627,94.594) 82.627,95.198 84.532,97.103 v2(84.532,97.844) ; 118.574,45.313 118.744,45.483 v2@118.744,58.147 ; 118.574,81.313 118.744,81.483 v2@118.744,94.147 ; 120.352,45.178 120.479,45.305 120.479,51.744 121.632,52.897 122.036,53.302 127.787,53.302 128.734,54.248 128.734,57.506 127.292,58.948 127.292,59.951 126.798,60.445 126.334,60.445 126.321,60.433 126.073,60.433 ; 120.352,81.178 120.479,81.305 120.479,87.744 121.632,88.897 122.036,89.302 127.787,89.302 128.734,90.248 128.734,93.506 127.292,94.948 127.292,95.951 126.798,96.445 126.334,96.445 126.321,96.433 126.073,96.433 ; v2(130.627,58.594) 130.627,59.197 132.532,61.103 v2(132.532,61.844) ; v2(130.627,94.594) 130.627,95.198 132.532,97.103 v2(132.532,97.844)
  Mid-Layer 2 w0.508: v2(71.439,62.079) 70.336,62.079 69.323,61.066 69.323,60.033 66.077,56.787 66.068,56.787 66.068,47.911 64.907,46.75 64.907,44.544 65.338,44.114 72.718,44.114 73.701,45.097 73.701,48.099 v1(73.283,48.099) 73.744,48.56 ; v2(71.439,98.079) 70.336,98.079 66.068,93.811 66.068,83.911 64.907,82.75 64.907,80.544 65.338,80.114 72.718,80.114 73.701,81.097 73.701,84.099 v1(73.283,84.099) 73.744,84.56 ; 74.392,48.988 75.019,48.988 ; 74.392,84.988 75.019,84.988 ; 75.019,48.721 75.019,48.988 ; 75.019,84.721 75.019,84.988 ; v2(79.047,62.076) 79.047,61.075 81.369,58.752 81.369,52.671 80.109,51.411 76.045,51.411 75.019,50.385 75.019,48.988 ; v2(79.047,98.076) 79.047,97.075 81.369,94.752 81.369,88.671 80.109,87.411 76.045,87.411 75.019,86.385 75.019,84.988 ; v2@83.083,58.322 85.052,56.354 ; v2@83.083,94.322 85.052,92.354 ; 91.91,56.354 85.052,56.354 ; 91.91,92.354 85.052,92.354 ; v2(119.439,62.079) 118.336,62.079 117.323,61.066 117.323,60.033 114.077,56.787 114.068,56.787 114.068,47.911 112.907,46.75 112.907,44.544 113.338,44.114 120.718,44.114 121.701,45.097 121.701,48.099 v1(121.283,48.099) 121.744,48.56 ; v2(119.439,98.079) 118.336,98.079 114.068,93.811 114.068,83.911 112.907,82.75 112.907,80.544 113.338,80.114 120.718,80.114 121.701,81.097 121.701,84.099 v1(121.283,84.099) 121.744,84.56 ; 122.392,48.988 123.019,48.988 ; 122.392,84.988 123.019,84.988 ; 123.019,48.721 123.019,48.988 ; 123.019,84.721 123.019,84.988 ; v2(127.047,62.076) 127.047,61.075 129.369,58.752 129.369,52.671 128.109,51.411 124.045,51.411 123.019,50.385 123.019,48.988 ; v2(127.047,98.076) 127.047,97.075 129.369,94.752 129.369,88.671 128.109,87.411 124.045,87.411 123.019,86.385 123.019,84.988 ; v2@131.083,58.322 133.052,56.354 ; v2@131.083,94.322 133.052,92.354 ; 139.91,56.354 133.052,56.354 ; 139.91,92.354 133.052,92.354 ; 75.019,48.988 82.639,48.988 85.052,51.401 85.052,56.354 ; 75.019,84.988 82.639,84.988 85.052,87.401 85.052,92.354 ; 123.019,48.988 130.639,48.988 133.052,51.401 133.052,56.354 ; 123.019,84.988 130.639,84.988 133.052,87.401 133.052,92.354
  Bottom Layer w0.147: v1(67.808,55.529) 69.426,55.529 72.33,58.433 v1(73.192,58.433) ; v1(67.808,91.529) 69.426,91.529 72.33,94.433 v1(73.192,94.433) ; v1(67.823,56.015) 69.443,56.015 72.26,58.833 v1(73.192,58.833) ; v1(67.823,92.015) 69.443,92.015 72.26,94.833 v1(73.192,94.833) ; v1(91.367,58.734) 91.367,54.465 v1(92.178,53.654) ; v1(91.367,94.734) 91.367,90.465 v1(92.178,89.654) ; v1(115.808,55.529) 117.426,55.529 120.33,58.433 v1(121.192,58.433) ; v1(115.808,91.529) 117.426,91.529 120.33,94.433 v1(121.192,94.433) ; v1(115.823,56.015) 117.443,56.015 120.26,58.833 v1(121.192,58.833) ; v1(115.823,92.015) 117.443,92.015 120.26,94.833 v1(121.192,94.833) ; v1(139.367,58.734) 139.367,54.465 v1(140.178,53.654) ; v1(139.367,94.734) 139.367,90.465 v1(140.178,89.654)
  Bottom Layer w0.203: v1(65.113,94.976) 64.304,94.976 62.827,93.499 62.827,91.719 66.219,88.326 68.198,88.326 v1(72.757,92.885) ; v1(66.637,51.401) 66.637,47.128 v1(71.254,42.511) ; v1(66.637,53.306) 66.637,56.657 68.127,58.147 69.771,58.147 70.457,58.833 71.53,58.833 72.33,59.633 v1(73.192,59.633) ; v1(66.637,87.401) 66.637,83.128 v1(71.254,78.511) ; v1(66.637,89.306) 66.637,92.657 68.127,94.147 69.771,94.147 70.457,94.833 71.53,94.833 72.33,95.633 v1(73.192,95.633) ; v1(69.555,58.833) 69.555,59.276 70.311,60.033 v1(73.192,60.033) ; v1(69.555,94.833) 69.555,95.276 70.311,96.033 v1(73.192,96.033) ; v1(73.022,54.188) 73.022,54.798 73.992,55.768 73.992,57.728 v1(73.992,58.033) ; v1(73.022,90.188) 73.022,90.798 73.992,91.768 73.992,93.728 v1(73.992,94.033) ; v1(73.192,58.033) 73.192,56.037 71.844,54.689 71.844,52.671 72.352,52.163 88.481,52.163 89.243,52.925 89.243,55.156 81.54,62.859 v1(81.54,65.736) v1@81.54,65.752 ; v1(73.192,94.033) 73.192,92.037 71.844,90.689 71.844,88.671 72.352,88.163 88.481,88.163 89.243,88.925 89.243,91.156 81.54,98.859 v1(81.54,101.708) ; v1(73.592,58.033) 73.592,55.89 72.479,54.777 72.479,53.433 73.393,52.518 81.979,52.518 84.178,54.717 84.178,57.904 v1(84.532,58.259) ; v1(73.592,94.033) 73.592,91.89 72.479,90.777 72.479,89.433 73.393,88.518 81.979,88.518 84.178,90.717 84.178,93.904 v1(84.532,94.259) ; v1(73.727,54.945) 73.568,54.786 73.568,53.984 74.276,53.276 78.142,53.276 81.8,53.276 v1(82.178,53.654) ; v1(73.727,90.945) 73.568,90.786 73.568,89.984 74.276,89.276 78.142,89.276 81.8,89.276 v1(82.178,89.654) ; v1(74.013,54.324) 74.019,54.324 74.392,54.697 v1(74.392,58.033) ; v1(74.013,90.324) 74.019,90.324 74.392,90.697 v1(74.392,94.033) ; v1(74.392,54.099) 74.804,53.687 81.501,53.687 83.384,55.57 cw(c84.178,55.229) 83.543,55.814 83.543,57.949 84.702,59.108 ; v1(74.392,90.099) 74.804,89.687 81.501,89.687 83.384,91.57 cw(c84.178,91.229) 83.543,91.814 83.543,93.949 84.702,95.108 ; v1(74.771,56.455) 74.792,56.476 v1(74.792,58.033) ; v1(74.771,92.455) 74.792,92.476 v1(74.792,94.033) ; v1(75.187,56.449) 75.908,57.171 75.908,57.633 75.508,58.033 v1(75.192,58.033) ; v1(75.187,92.449) 75.908,93.171 75.908,93.633 75.508,94.033 v1(75.192,94.033) ; v1(75.192,59.633) 75.546,59.278 76.893,59.278 77.135,59.278 v1(78.793,59.278) ; v1(75.192,95.633) 75.546,95.278 76.893,95.278 77.135,95.278 v1(78.793,95.278) ; v1(81.54,61.499) 82.31,61.499 84.702,59.108 ; v1(81.54,97.499) 82.31,97.499 84.702,95.108 ; v1(84.532,60.403) 84.784,60.403 86.449,62.069 91.021,62.069 92.926,60.164 92.926,57.624 93.986,56.564 94.323,56.564 94.323,51.274 93.815,50.766 89.067,50.766 v1(88.178,51.655) ; v1(84.532,96.403) 84.784,96.403 86.449,98.069 91.021,98.069 92.926,96.164 92.926,93.624 93.986,92.564 94.323,92.564 94.323,87.274 93.815,86.766 89.067,86.766 v1(88.178,87.655) ; v1(88.178,53.654) 88.178,55.632 84.702,59.108 ; v1(88.178,89.654) 88.178,91.632 84.702,95.108 ; v1(112.926,94.903) 112.926,95.02 112.985,95.08 112.552,95.08 112.375,94.903 112.232,94.903 110.827,93.499 110.827,91.719 114.219,88.326 116.198,88.326 v1(120.757,92.885) ; v1(114.637,51.401) 114.637,47.128 v1(119.254,42.511) ; v1(114.637,53.306) 114.637,56.657 116.127,58.147 117.771,58.147 118.457,58.833 119.53,58.833 120.33,59.633 v1(121.192,59.633) ; v1(114.637,87.401) 114.637,83.128 v1(119.254,78.511) ; v1(114.637,89.306) 114.637,92.657 116.127,94.147 117.771,94.147 118.457,94.833 119.53,94.833 120.33,95.633 v1(121.192,95.633) ; v1(117.555,58.833) 117.555,59.276 118.311,60.033 v1(121.192,60.033) ; v1(117.555,94.833) 117.555,95.276 118.311,96.033 v1(121.192,96.033) ; v1(121.022,54.188) 121.022,54.798 121.992,55.768 121.992,57.728 v1(121.992,58.033) ; v1(121.022,90.188) 121.022,90.798 121.992,91.768 121.992,93.728 v1(121.992,94.033) ; v1(121.192,58.033) 121.192,56.037 119.844,54.689 119.844,52.671 120.352,52.163 136.481,52.163 137.243,52.925 137.243,55.156 129.541,62.859 v1@129.541,65.752 ; v1(121.192,94.033) 121.192,92.037 119.844,90.689 119.844,88.671 120.352,88.163 136.481,88.163 137.243,88.925 137.243,91.156 129.541,98.859 v1(129.541,101.752) ; v1(121.592,58.033) 121.592,55.89 120.479,54.777 120.479,53.433 121.393,52.518 129.979,52.518 132.178,54.717 132.178,57.904 v1(132.532,58.259) ; v1(121.592,94.033) 121.592,91.89 120.479,90.777 120.479,89.433 121.393,88.518 129.979,88.518 132.178,90.717 132.178,93.904 v1(132.532,94.259) ; v1(121.727,54.945) 121.568,54.786 121.568,53.984 122.276,53.276 126.142,53.276 129.8,53.276 v1(130.178,53.654) ; v1(121.727,90.945) 121.568,90.786 121.568,89.984 122.276,89.276 126.142,89.276 129.8,89.276 v1(130.178,89.654) ; v1(122.013,54.324) 122.019,54.324 122.392,54.697 v1(122.392,58.033) ; v1(122.013,90.324) 122.019,90.324 122.392,90.697 v1(122.392,94.033) ; v1(122.392,54.099) 122.804,53.687 129.501,53.687 131.384,55.57 cw(c132.178,55.229) 131.543,55.814 131.543,57.949 132.702,59.108 ; v1(122.392,90.099) 122.804,89.687 129.501,89.687 131.384,91.57 cw(c132.178,91.229) 131.543,91.814 131.543,93.949 132.702,95.108 ; v1(122.771,56.455) 122.792,56.476 v1(122.792,58.033) ; v1(122.771,92.455) 122.792,92.476 v1(122.792,94.033) ; v1(123.187,56.449) 123.908,57.171 123.908,57.633 123.508,58.033 v1(123.192,58.033) ; v1(123.187,92.449) 123.908,93.171 123.908,93.633 123.508,94.033 v1(123.192,94.033) ; v1(123.192,59.633) 123.546,59.278 124.893,59.278 125.135,59.278 v1(126.793,59.278) ; v1(123.192,95.633) 123.546,95.278 124.893,95.278 125.135,95.278 v1(126.793,95.278) ; v1(129.541,61.499) 130.31,61.499 132.702,59.108 ; v1(129.541,97.499) 130.31,97.499 132.702,95.108 ; v1(132.532,60.403) 132.784,60.403 134.449,62.069 139.021,62.069 140.926,60.164 140.926,57.624 141.986,56.564 142.323,56.564 142.323,51.274 141.815,50.766 137.067,50.766 v1(136.178,51.655) ; v1(132.532,96.403) 132.784,96.403 134.449,98.069 139.021,98.069 140.926,96.164 140.926,93.624 141.986,92.564 142.323,92.564 142.323,87.274 141.815,86.766 137.067,86.766 v1(136.178,87.655) ; v1(136.178,53.654) 136.178,55.632 132.702,59.108 ; v1(136.178,89.654) 136.178,91.632 132.702,95.108